# Altium PCB ASCII-v2.0.PcbDoc (part 4 of 5)
Units mil, origin at the board's own origin, x right, y up, seen from the top; angles counter-clockwise.
Board outline 1968.5 x 4921.26 mil, 4 copper layers (Top Layer, Layer 1, Layer 2, Bottom Layer), stack 62.45 mil thick; 272 components, 175 nets, 1155 pads, 394 vias.
Unrouted connection lines stored in the file: 146.
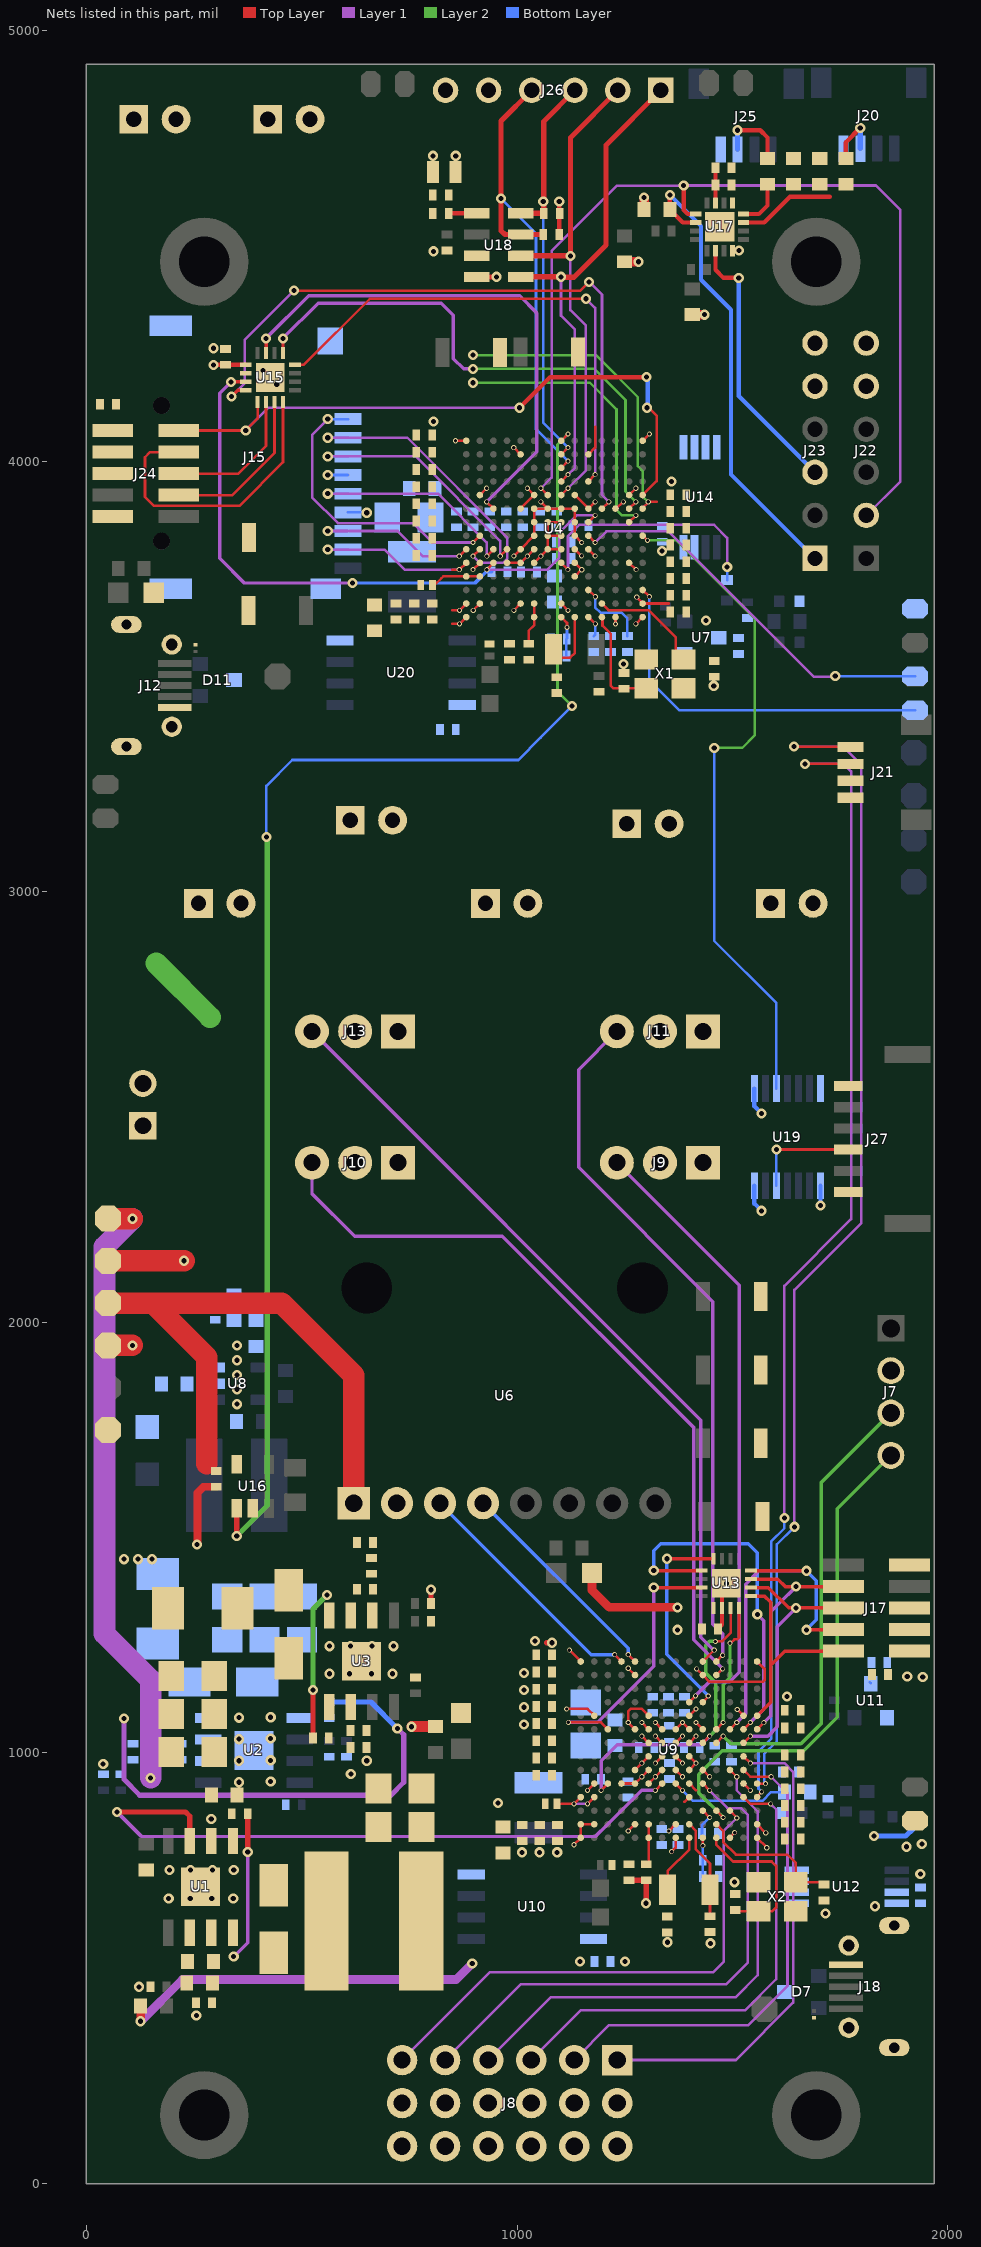
[diagram p4: the nets of this part, all layers, seen from the top]

## Via types
v1: diameter 23.62, hole 11.81, Top Layer to Bottom Layer, tented both sides, 119 vias
v2: diameter 23.62, hole 11.81, Top Layer to Bottom Layer, 104 vias
v3: diameter 11.81, hole 7.87, Top Layer to Bottom Layer, 89 vias
v4: diameter 11.81, hole 7.87, Top Layer to Bottom Layer, tented both sides, 82 vias

## Nets (pads, with @x,y where several pads share a name; then routed paths per layer and width w, separated by ;. In a path a pad name is that pad's centre, name@x,y a point inside that pad or via, vN(x,y) a via of type N, cw(c..) or ccw(c..) an arc to the next point about the centre after c; other vN are vias at no path point) (continued)
F13_1: (continued)
  Top Layer w6: U4.F13@1260.2,3889.74 v3(1275.95,3905.49)
  Top Layer w8: U15.13@456.53,4251.09 v2@456.53,4285.16
  Layer 1 w8: v2(456.37,4285) 538.37,4367 824,4367 852,4339 852,4238 875.83,4214.17 v2(897.8,4214.17)
  Layer 2 w6: v2(897.8,4214.17) 1179.83,4214.17 1252,4142 1252,3929.44 v3(1275.95,3905.49)
G11: J7.3 U9.G11 | length 1065.3
  Top Layer w6: U9.G11@1462.98,1023.51 v4(1478.73,1039.26)
  Layer 2 w8: v4(1478.73,1039.26) 1496.98,1021.01 1659.37,1021.01 1707,1068.64 1707,1628.43 J7.3@1868,1789.43
GND: C3.1 C4.1 C5.1 C6.1 C7.1 C8.1 C9.1 C10.1 C11.1 C13.1 C14.1 C15.1 C16.1 C17.1 C18.1 C19.1 C20.1 C21.1 C22.1 C23.1 C24.1 C25.1 C26.1 C27.1 C29.1 C30.1 C31.1 C32.1 C33.1 C34.1 C35.1 C36.1 C37.1 C38.1 C39.1 C40.1 C41.1 C42.1 C43.1 C44.1 C45.1 C46.1 C47.1 C48.1 C49.1 C50.1 C51.1 C52.1 C53.1 C54.1 C55.1 C56.1 C57.1 C58.1 C59.1 C60.1 C61.1 C62.1 C63.1 C64.1 C65.1 C66.1 C67.1 C68.1 C69.1 C70.1 C71.1 C72.2 C73.2 C74.1 C75.1 C76.2 C77.2 C78.1 C79.1 C80.1 C81.1 C82.1 C83.1 C84.1 C85.1 C86.1 C87.1 C88.1 C89.1 C90.1 C91.1 C92.1 C93.1 C94.1 C95.1 C96.1 C97.1 C98.1 C99.1 C100.1 C101.1 C102.1 C103.1 C104.1 C105.1 C106.1 C107.1 C108.1 C109.1 C110.1 C111.1 C112.1 C113.1 C114.1 C115.1 C116.1 C117.1 C118.2 C119.2 C120.1 C121.1 C122.1 C123.1 C124.2 C125.2 C126.1 C127.1 C128.1 C129.1 C130.1 C131.2 C132.1 C133.1 C134.1 D1.2 D2.2 D3.1 D4.2 D6.1 D7.3 D11.3 J1.2 J2.2 J3.2 J5.2 J6.2 J7.2 J8.3 J8.6 J8.9 J8.12 J8.15 J8.18 J9.2 J10.2 J11.2 J12.5 J12.S1 J12.S2 J12.S3 J12.S4 J13.2 J15.6 J15.MP1 J15.MP2 J15.MP3 J15.MP4 J16.2 J17.3 J17.5 J17.9 J18.5 J18.S1 J18.S2 J18.S3 J18.S4 J19.2 J20.1 J21.1 J22.6 J23.6 J24.3 J24.5 J24.9 J25.1 J26.6 J27.1 LED1.2 R4.1 R5.1 R8.1 R9.1 R11.1 R19.1 R20.1 R22.1 R24.1 SB4.2 SB6.2 SW1.2 SW2.2 SW3.2 SW4.1 SW5.2 SW6.2 SW7.2 SW8.1 TP2.2 TP8.1 TP15.2 U1.7 U1.9 U2.7 U2.9 U3.7 U3.9 U4.A1 U4.A14 U4.B5 U4.B10 U4.E2 U4.E13 U4.G7 U4.G8 U4.H7 U4.H8 U4.J7 U4.J8 U4.K2 U4.K6 U4.K9 U4.K13 U4.L9 U4.N1 U4.N2 U4.N5 U4.N8 U4.P1 U4.P14 U6.2 U7.1 U8.2 U9.A1 U9.A14 U9.B5 U9.B10 U9.E2 U9.E13 U9.G7 U9.G8 U9.H7 U9.H8 U9.J7 U9.J8 U9.K2 U9.K6 U9.K9 U9.K13 U9.L9 U9.N1 U9.N2 U9.N5 U9.N8 U9.P1 U9.P14 U10.4 U11.1 U12.1 U12.2 U12.3 U12.4 U12.7 U13.2 U13.17 U14.1 U14.2 U14.3 U14.4 U14.7 U15.2 U15.17 U16.2 U17.13 U17.17 U18.3 U19.7 U20.4 X1.2 X1.4 X2.2 X2.4 | length 1870.7
  Top Layer w6: 849.57,3622.02 v3(866.5,3622.02) U4.P1@882.25,3637.77 ; 849.57,3653.52 v3(866.5,3653.52) U4.N1@882.25,3669.27 ; v3(857.1,4047.22) 857.22,4047.22 U4.A1@882.25,4047.22 ; v3(897.68,3748.17) 897.92,3748.17 913.51,3763.76 U4.K2@913.74,3763.76 ; v3(898.31,3653.52) 898.31,3653.68 913.74,3669.11 U4.N2@913.74,3669.27 ; U4.E2@913.74,3921.24 v3(929.49,3936.98) ; v3(992.48,4031.47) U4.B5@1008.23,4015.72 ; v3(992.8,3653.52) 992.8,3653.68 1008.23,3669.11 U4.N5@1008.23,3669.27 ; U4.K6@1039.73,3763.76 v3(1055.48,3779.5) U4.J7@1071.22,3795.25 ; U4.N8@1102.72,3669.27 v3(1118.47,3653.52) ; U4.J8@1102.72,3795.25 U4.J7@1071.22,3795.25 ; U4.H8@1102.72,3826.75 U4.H7@1071.22,3826.75 ; U4.G8@1102.72,3858.24 U4.G7@1071.22,3858.24 U4.H7@1071.22,3826.75 ; v4(1115.35,1102.25) 1163.77,1102.25 U9.E2@1179.52,1086.5 ; v4(1121.64,1238.88) U9.A1@1148.02,1212.49 ; v4(1132.28,786.98) 1132.28,787.13 1148.02,802.88 U9.P1@1148.02,803.04 U9.N1@1148.02,834.54 U9.N2@1179.52,834.54 ; U4.L9@1134.22,3732.26 1134.49,3732.26 1150.01,3747.78 v3(1150.28,3747.78) ; U4.K9@1134.22,3763.76 v3@1149.96,3748.01 ; v4(1163.77,913.28) U9.K2@1179.52,929.02 ; U4.B10@1165.71,4015.72 1181.46,4031.47 1181.46,4079.9 ; v4(1258.26,818.79) U9.N5@1274.01,834.54 ; v4(1258.26,1196.74) U9.B5@1274.01,1180.99 ; U4.K13@1260.2,3763.76 1260.49,3763.76 1276.24,3748.01 v3(1276.54,3748.01) ; U4.E13@1260.2,3921.24 v3(1275.95,3936.98) ; v3(1275.93,3622) U4.P14@1291.62,3637.69 ; U4.A14@1291.7,4047.22 v3(1307.44,4062.97) ; U9.K6@1305.5,929.02 v4(1321.25,944.77) U9.J7@1337,960.52 ; v4(1321.25,976.27) U9.H7@1337,992.02 ; v4(1321.25,1039.26) U9.G7@1337,1023.51 ; v4(1352.75,818.79) U9.N8@1368.5,834.54 ; U9.J8@1368.5,960.52 v4(1384.24,944.77) ; U9.H8@1368.5,992.02 v4(1384.24,976.27) ; U9.G8@1368.5,1023.51 v4(1384.24,1039.26) ; 1388.76,886.28 U9.L9@1399.99,897.53 ; U9.K9@1399.99,929.02 1415.74,913.28 ; v4(1416.98,1195.5) U9.B10@1431.49,1180.99 1447.48,1165 1571,1165 1575,1169 1575,1194.96 U9.A14@1557.47,1212.49 ; v4(1511.47,1101.01) U9.E13@1525.98,1086.5 ; U9.K13@1525.98,929.02 v4(1541.72,913.28) ; U9.P14@1557.47,803.04 v4@1580.3,780.21 ; U4.J7@1071.22,3795.25 U4.H7@1071.22,3826.75
  Top Layer w10: C80.1@1466.5,1288 1476.16,1297.66 U13.2@1476.16,1336.91 1476.16,1384.16 v1(1486,1394)
  Top Layer w12: C30.1@1260,704.52 C31.1@1300,704.52 1300,651.5 v1(1299.5,651.01)
  Top Layer w18: v1(257,1484) 258,1485 258,1604.1 271.9,1618 C128.1@301.5,1618
  Top Layer w22: v2(410,4210) 420,4210 425,4205 425,4194 U15.17@427,4194
  Bottom Layer w6: J15.6@607.54,3881.05 649.95,3881.05 v2(651,3880)
  other v1: 255.28,390.29 122,457 1251,516 1449,558 1349.37,560.37 1716.5,627.01 191.11,662.12 241.11,662.12 291.11,662.12 341.11,662.12 1505,700 1936.5,719.01 193.11,728.12 242.11,728.12 293.11,728.12 342.11,728.12 1011.28,769.29 1052.28,769.29 1093.28,769.29 1904.48,782.28 1940,788.26 354,932 428,934 354,982 651,982 428,983 354,1032 428,1034 1016,1066.21 354,1082 428,1083 1016,1106.14 1016,1146.07 564.81,1184 611,1184 662,1184 711,1184 1016,1186 564.81,1248 613,1248 663,1248 713,1248 1042,1260 350,1946
  other v2: 350,1810 350,1844 350,1878 350,1912 1456.75,3478.22 1247,3529 442.09,4178 295,4262 806.21,4487.21 805,4709
  other v4: 1580,779.91
H13: J8.1 U9.H13 | length 1129.2
  Top Layer w6: U9.H13@1525.98,992.02 v4(1541.72,976.27)
  Layer 1 w6: J8.1@1233,287 1508,287 1641.19,420.19 1641.19,955.81 1620.73,976.27 v4(1541.72,976.27)
I2C0_SCL: J21.4 U9.K14 | length 2785.2
  Top Layer w6: U9.K14@1557.47,929.02 1576.77,929 v4(1576.91,928.87) ; v2(1643,3337) 1643.69,3336.31 J21.4@1774.44,3336.31
  Layer 1 w6: v2(1643,3337) 1757,3337 1799,3295 1799,2230 1644.2,2075.2 v1(1644.2,1525.2)
  Bottom Layer w6: v4(1576.91,928.87) 1574,931.77 1574,998 1603.15,1027.15 1603.15,1484.15 v1(1644.2,1525.2)
I2C0_SDA: J21.3 U9.L14 | length 2697.7
  Top Layer w6: U9.L14@1557.47,897.53 1557.47,898.25 1568.19,908.96 v4(1568.19,909.68) ; v2(1669,3297) 1669.06,3296.94 J21.3@1774.44,3296.94
  Layer 1 w6: v1(1620.88,1545.85) 1620.88,2084.86 1775.68,2239.66 1775.68,3279.32 1758.03,3296.97 v2(1669,3297)
  Bottom Layer w6: v4(1568.19,909.68) 1560.77,917.09 1560.77,1003.48 1589.92,1032.62 1589.92,1490.92 1620.88,1521.88 v1(1620.88,1545.85)
I2C1_SCL: TP10.1 U4.M14 | length 862.3
  Top Layer w6: U4.M14@1291.7,3700.76 v3(1307.44,3685.17)
  Bottom Layer w6: v3(1307.44,3685.17) 1307.44,3490.85 1377.04,3421.26 TP10.1@1924.44,3421.26
I2C1_SDA: TP10.2 U4.H10 | length 917.3
  Top Layer w6: U4.H10@1165.71,3826.75 v3(1181.46,3811)
  Layer 1 w6: v3(1181.46,3811) 1207.46,3837 1352,3837 1690,3499 1737,3499 v2(1739,3501)
  Bottom Layer w6: v2(1739,3501) 1740,3500 TP10.2@1924.44,3500
I2C2_SCL: J26.4 R27.1 U4.C8 U18.7 | length 1153.8
  Top Layer w6: U4.C8@1102.72,3984.23 v3(1118.47,3999.98)
  Top Layer w12: J26.4@1034,4861 963,4790 963,4535 972,4526 R27.1@1061,4526
  Bottom Layer w6: v2(963,4610) 1044,4529 1044,4074.44 v3(1118.47,3999.98)
I2C2_SDA: J26.3 R29.1 U4.B8 U18.8 | length 986.6
  Top Layer w6: U4.B8@1102.72,4015.72 v3(1118.47,4031.47)
  Top Layer w12: U18.8@1009,4575.43 1061.57,4575.43 R29.1@1062,4575 1062,4789 J26.3@1134,4861
  Bottom Layer w6: v2(1061,4603) 1061,4088.94 v3(1118.47,4031.47)
INT_0: J22.2 U4.E7 U17.1 | length 2311.1
  Top Layer w6: v3(1055.48,3936.98) U4.E7@1071.22,3921.24
  Top Layer w10: v2(1387,4640) 1387,4583.02 1396.33,4573.69 U17.1@1415.17,4573.69
  Layer 1 w6: v3(1055.48,3936.98) 1080.38,3961.89 1080.38,4488.38 1231.81,4639.81 1386.81,4639.81 v2(1387,4640) 1833.67,4640 1890,4583.67 1890,3953 J22.2@1811,3874
INT_1: J26.2 U4.E8 U18.6 | length 1139.4
  Top Layer w6: U4.E8@1102.72,3921.24 v3(1118.47,3936.98)
  Top Layer w12: U18.6@1009,4477 1123,4477 v2(1124,4476) 1124,4751 J26.2@1234,4861
  Layer 1 w6: v3(1118.47,3936.98) 1160,3978.52 1160,4315 1124,4351 v2(1124,4476)
INT_2: J26.1 U4.D8 U18.5 | length 1142.6
  Top Layer w6: U4.D8@1102.72,3952.73 v3(1118.47,3968.48)
  Top Layer w12: U18.5@1009.21,4428 1108,4428 1109,4427 1132,4427 1207,4502 1207,4734 J26.1@1334,4861
  Layer 1 w6: v2(1102.19,4428) 1102.19,4337.81 1134.37,4305.63 1134.37,3984.39 v3(1118.47,3968.48)
J11: U6.3 U9.A4 | length 573.7
  Top Layer w6: v4(1226.76,1228.24) U9.A4@1242.51,1212.49
  Bottom Layer w8: U6.3@821,1580 1172.76,1228.24 v4(1226.76,1228.24)
J12: J8.10 U9.J12 | length 1210.8
  Top Layer w6: U9.J12@1494.48,960.52 v4(1510.23,944.77)
  Layer 1 w6: J8.10@933,287 1079,433 1508,433 1559,484 1559,864.5 1510.23,913.28 v4(1510.23,944.77)
J13: J8.4 U9.J13 | length 1138.5
  Top Layer w6: U9.J13@1525.98,960.52 1541.72,944.77 v4(1590.15,944.77)
  Layer 1 w6: J8.4@1133,287 1214,368 1537,368 1628.19,459.19 1628.19,906.73 v4(1590.15,944.77)
JTAG_TCK/SWD_CLK: J17.4 U9.F12 U13.8 | length 876.9
  Top Layer w6: U9.F12@1494.48,1055.01 v4(1510.23,1070.76)
  Top Layer w8: U13.8@1543.09,1423.53 v1@1672,1423.53 ; v1@1672,1286.51 J17.4@1757.96,1286.51
  Layer 1 w8: v4(1510.23,1070.76) 1531,1091.53 1531,1392 1562,1423 v1(1672,1423)
  Bottom Layer w8: v1(1672,1286) 1695,1309 1695,1400 v1(1672,1423)
JTAG_TCK/SWD_CLK_1: J24.4 U4.F12 U15.8 | length 711.1
  Top Layer w6: J24.4@214.77,4021 148,4021 136,4009 136,3917 157,3896 355,3896 456.53,3997.53 U15.8@456.53,4136.91 ; U4.F12@1228.7,3889.74 1229.93,3889.74 1245.68,3905.49 v3(1246.91,3905.49)
JTAG_TDI: J17.8 U9.F14 U13.7 | length 591.4
  Top Layer w6: U9.F14@1557.47,1055.01 v4@1573.22,1070.76 ; v4(1573.22,1070.6) v4@1573.38,1070.76
  Top Layer w8: U13.7@1543.09,1403.84 1605.16,1403.84 1622.49,1386.51 v1(1648,1386.51) J17.8@1757.96,1386.51
  Layer 1 w8: v4(1573.22,1070.6) 1589,1086.38 1589,1327.51 1607.67,1346.18 v1(1648,1386.51)
JTAG_TDI_1: J24.8 U4.F14 U15.7 | length 1095.4
  Top Layer w6: J24.8@214.77,3921 339,3921 436.84,4018.84 U15.7@436.84,4136.91 ; U4.F14@1291.7,3889.74 1291.7,3891 1304.77,3904.07 v3(1304.77,3905.34) ; v3@1307.44,3905.49 1324.37,3905.49
  Layer 2 w6: v2@897.33,4246.01 1182.99,4246.01 1280.38,4148.62 1280.38,3988.25 1291.85,3976.77 1291.85,3918.25 v3(1304.77,3905.34)
  other v2: 897.8,4246.34
JTAG_TDO: J17.6 U9.G13 U13.6 | length 621.8
  Top Layer w6: U9.G13@1525.98,1023.51 v4(1541.72,1039.26)
  Top Layer w8: U13.6@1543.09,1384.16 1583.84,1384.16 1631,1337 v1(1648,1337) ; v1@1648.25,1337.25 1648.49,1337 J17.6@1757.47,1337
  Layer 1 w8: v4(1541.72,1039.26) 1582.76,1039.26 1604,1060.5 1604,1293 v1(1648,1337)
JTAG_TDO_1: J24.6 U4.G13 U15.6 | length 995.2
  Top Layer w6: J24.6@214.77,3971 353,3971 417.16,4035.16 U15.6@417.16,4136.91 ; U4.G13@1260.2,3858.24 v3(1275.95,3873.99)
  Layer 2 w6: v2(897.8,4182) 1168.99,4182 1231,4119.99 1231,3887 1244.01,3873.99 v3(1275.95,3873.99)
JTAG_TMS/SWD_IO: J17.2 U9.E14 U13.5 | length 510.9
  Top Layer w8: U13.5@1543.09,1364.47 1574.53,1364.47 1589,1350 1589,1204 ; U9.E14@1557.47,1086.5 1589,1118.03 1589,1204 ; J17.2@1757.96,1236.51 1621.51,1236.51 1589,1204
JTAG_TMS/SWD_IO_1: J24.2 U4.E14 U15.5 | length 1515.9
  Top Layer w6: J24.2@214.77,4071 v2(370,4071) 397.47,4098.47 U15.5@397.47,4136.91 ; U4.E14@1291.7,3921.24 1324,3953.54 1324,4105.81 1305.81,4124 v2(1302.19,4124)
  Top Layer w10: v2(1006,4124) 1077,4195 v2(1301,4195) v2@1302.19,4195
  Layer 1 w6: v2(370,4071) 423,4124 v2(1006,4124)
  Bottom Layer w10: v2(1301,4195) 1303.41,4192.59 1303.41,4125.22 v2(1302.19,4124)
K3: R24.2 U9.G10 U9.K3 U13.3 | length 769.4
  Top Layer w6: v4(1195.27,913.28) U9.K3@1211.02,929.02 ; U9.G10@1431.49,1023.51 v4(1447.24,1039.26) ; v4(1460.58,1259) 1476.07,1259 1495.84,1278.77 U13.3@1495.84,1336.91
  Layer 1 w8: v4(1195.27,913.28) 1195.27,981.77 1232.5,1019.01 1426.98,1019.01 v4(1447.24,1039.26)
  Layer 2 w8: v4(1447.24,1039.26) 1461,1053.02 1461,1163 1438.36,1185.64 1438.36,1250.36 1447,1259 v4(1460.58,1259)
  Bottom Layer w6: v4(1195.27,913.28) R24.2@1195.27,939.02 R24.2@1196.5,939.02
K3_1: R11.2 U4.G10 U4.K3 U15.3 | length 1503.2
  Top Layer w6: v3(929.81,3747.69) 929.81,3748.01 945.24,3763.44 U4.K3@945.24,3763.76 ; U4.G10@1165.71,3858.24 v3(1181.46,3873.99)
  Top Layer w8: v2@335.84,4184.16 U15.3@369.91,4184.16
  Top Layer w10: v2@335.84,4184.16 v2(336,4184)
  Layer 1 w6: v3(929.81,3747.69) 930.12,3748.01 1070.74,3748.01 1098,3775.27 1098,3833.5 1138.49,3873.99 v3(1181.46,3873.99)
  Layer 1 w8: v2(336,4184) 310,4158 310,3774 367,3717 v2(618,3717)
  Bottom Layer w8: v2(618,3717) 902.5,3717 928.5,3743 R11.2@941,3743
K10: J8.13 U9.K10 | length 1274.4
  Top Layer w6: U9.K10@1431.49,929.02 v4(1447.24,913.28)
  Layer 1 w6: J8.13@833,287 1009,463 1486,463 1536,513 1536,856.01 1520,872.01 1488.5,872.01 v4(1447.24,913.28)
K11: U6.4 U9.A5 | length 513.7
  Top Layer w6: v4(1258.26,1228.24) U9.A5@1274.01,1212.49
  Bottom Layer w8: U6.4@921,1580 1258.26,1242.74 v4(1258.26,1228.24)
L13: J8.7 U9.L13 | length 1130
  Top Layer w6: U9.L13@1525.98,897.53 1541.72,881.78 v4(1588.97,881.78) v4@1590.15,881.78
  Layer 1 w6: J8.7@1033,287 1149,403 1530.37,403 1602,474.63 1602,868.75 v4(1588.97,881.78)
M11: J7.4 U9.M11 | length 1181.9
  Top Layer w6: U9.M11@1462.98,866.03 v4(1478.73,850.28)
  Layer 2 w8: v4(1478.73,850.28) 1422,907.02 1422,950 1477,1005 1666,1005 1744,1083 1744,1567 J7.4@1868,1691
M12: J8.16 U9.M12 | length 1210.5
  Top Layer w6: U9.M12@1494.48,866.03 v4@1510.23,850.28 ; v4(1510.23,849.1) v4@1510.34,849.21
  Layer 1 w6: J8.16@733,287 937,491 1456,491 1480,515 1480,818.87 v4(1510.23,849.1)
MISO: J23.3 U17.6 | length 631.6
  Top Layer w10: U17.6@1460.74,4488.74 1460.74,4444.26 1479.5,4425.5 1514.69,4425.5 v2(1515,4425.19)
  Bottom Layer w10: v2(1515,4425.19) 1514.84,4425.34 1514.84,4151.16 J23.3@1692,3974
NetC1_1: C1.1 D4.1 L3.1 U1.8 | length 345.6
  Top Layer w12: v1(374.61,769.93) C1.1@374.61,859.12
  Layer 1 w8: v1(342,527) 374.61,559.61 v1(374.61,769.93)
NetC1_2: C1.2 U1.1
NetC2_1: C2.1 D1.1 L1.1 U2.8 | length 1133.6
  Layer 1 w12: v1(87,1080) 87,939 124,902 707,902 737,932 737,1042.19 v1(722,1057.19)
  Bottom Layer w12: C2.1@564,1118.5 660.69,1118.5 v1(722,1057.19)
NetC2_2: C2.2 U2.1
NetC10_2: C10.2 R3.1 U2.6
NetC11_2: C11.2 R3.2
NetC12_1: C12.1 D2.1 L2.1 U3.8 | length 345.6
  Top Layer w12: C12.1@526,1035 v1(526,1146.19)
  Layer 2 w12: v1(526,1146.19) 526,1334.19 v1(558.81,1367)
NetC12_2: C12.2 U3.1
NetC16_2: C16.2 R7.2 U3.6
NetC17_2: C17.2 R7.1
NetC18_2: C18.2 C19.2 FB3.2 U4.N6 U4.P6 | length 98.7
  Top Layer w6: C18.2@1027.25,3575.72 1027.25,3606.25 1039.73,3618.73 U4.P6@1039.73,3637.77 U4.N6@1039.73,3669.27
NetC20_2: C20.2 C26.2 U4.P8 | length 96.1
  Top Layer w6: U4.P8@1102.72,3637.77 1116,3624.49 v3(1116,3614)
  Bottom Layer w6: C26.2@1114.75,3547.72 1114.75,3586.72 1116,3587.98 v3(1116,3614)
NetC24_2: C24.2 R18.2 U1.6
NetC25_2: C25.2 R18.1
NetC28_1: C28.1 R21.1 R22.2 U8.3
NetC30_2: C30.2 C31.2 FB1.2 U9.N6 U9.P6 | length 95.3
  Top Layer w6: C31.2@1300,741.52 1305.5,747.02 U9.P6@1305.5,803.04 U9.N6@1305.5,834.54
NetC32_2: C32.2 C33.2 U9.P8 | length 36
  Top Layer w6: v4(1359,771.02) 1368.5,780.51 U9.P8@1368.5,803.04
NetC34_2: C34.2 C35.2 U9.P10 | length 91.1
  Top Layer w6: U9.P10@1431.49,803.04 v4(1431.5,785.01) v4@1432.59,785.01
  Bottom Layer w6: C35.2@1431.5,713.01 C34.2@1431.5,751.01 v4(1431.5,785.01)
NetC36_2: C36.2 U9.M10 | length 76.9
  Top Layer w6: U9.M10@1431.49,866.03 v4(1447.24,850.28)
  Bottom Layer w6: C36.2@1429.5,803.03 C36.2@1429.5,813.01 1429.5,832.55 v4(1447.24,850.28)
NetC56_2: C56.2 C57.2 C58.2 C59.2 FB2.2 U9.L1 U9.L2 | length 115.4
  Top Layer w6: FB2.2@1093,882.02 1093.24,881.78 v4(1132.28,881.78) U9.L1@1148.02,897.53 ; v4(1163.77,881.78) U9.L2@1179.52,897.53
  Layer 1 w6: v4(1132.28,881.78) v4(1163.77,881.78)
NetC61_2: C61.2 C62.2 C63.2 C64.2 C65.2 C66.2 C67.2 C68.2 C69.2 C70.2 C71.2 C74.2 L5.1 U9.F6 U9.F7 U9.F8 U9.F9 U9.G6 U9.G9 U9.H6 U9.H9 U9.J5 U9.J9 | length 222.7
  Top Layer w6: U9.J5@1274.01,960.52 v4(1289.76,976.27) U9.H6@1305.5,992.02 ; v4(1289.76,1039.26) U9.G6@1305.5,1023.51 ; v4(1289.76,1070.76) U9.F6@1305.5,1055.01 ; v4(1321.25,1070.76) U9.F7@1337,1055.01 ; U9.F8@1368.5,1055.01 v4(1384.24,1070.76) U9.F9@1399.99,1055.01 ; U9.J9@1399.99,960.52 v4(1415.74,976.27) U9.H9@1399.99,992.02 ; U9.G9@1399.99,1023.51 v4(1415.74,1039.26)
NetC72_1: C72.1 U9.N11 X2.1 | length 346.7
  Top Layer w6: U9.N11@1462.98,834.54 1478.5,819.02 1478.5,793.64 1508.13,764.01 1627.52,764.01 1647.31,744.22 X2.1@1647.31,699.48 C72.1@1712.71,699.48
NetC73_1: C73.1 U9.P11 X2.3 | length 371.5
  Top Layer w6: U9.P11@1462.98,803.04 1462.5,803.52 1462.5,787.01 1501.5,748.01 1591.5,748.01 1601.5,738.01 1601.5,640.92 1593.13,632.55 X2.3@1560.69,632.55 C73.1@1507,632.55
NetC76_1: C76.1 U9.P9 X3.2 | length 141.8
  Top Layer w6: X3.2@1349.79,682.02 1349.79,726.06 1399.99,776.27 U9.P9@1399.99,803.04
NetC77_1: C77.1 U9.N9 X3.1 | length 233.5
  Top Layer w6: U9.N9@1399.99,834.54 1415.5,819.02 1415.5,776.02 1448.21,743.31 X3.1@1448.21,682.02 C77.1@1448.21,621.02
NetC78_2: C78.2 C79.2 D10.1 U9.K8 | length 277.4
  Top Layer w6: U9.K8@1368.5,929.02 v4(1384.24,913.28)
  Bottom Layer w6: v4(1384.24,913.28) 1408.51,889.01 1570.01,889.01 1590.02,909.02 C78.2@1621,909.02
NetC81_2: C81.2 C82.2 U4.P10 | length 52.8
  Top Layer w6: U4.P10@1165.71,3637.77 1166.03,3637.77 1181.78,3622.02 v3(1182.09,3622.02)
  Bottom Layer w6: C82.2@1178.25,3593.72 1181.46,3596.94 1181.46,3621.39 v3(1182.09,3622.02)
NetC83_2: C83.2 U4.M10 | length 174.1
  Top Layer w6: U4.M10@1165.71,3700.76 1166.03,3700.76 1181.78,3685.02 v3(1182.09,3685.02)
  Bottom Layer w6: v3(1182.09,3685.02) 1181.46,3684.39 1181.46,3660.54 1194,3648 1243,3648 1256.25,3634.75 C83.2@1256.25,3593.72
NetC102_2: C102.2 C103.2 C104.2 C105.2 FB4.2 U4.L1 U4.L2 | length 118.1
  Top Layer w6: FB4.2@804,3712 808.39,3712 824.39,3728 828.65,3732.26 U4.L2@913.74,3732.26
NetC107_2: C107.2 C108.2 C109.2 C110.2 C111.2 C112.2 C113.2 C114.2 C115.2 C116.2 C117.2 C120.2 L6.1 U4.F6 U4.F7 U4.F8 U4.F9 U4.G6 U4.G9 U4.H6 U4.H9 U4.J5 U4.J9 | length 353.7
  Top Layer w6: v3(992.8,3779.66) v3(992.8,3779.66) U4.J5@1008.23,3795.25 U4.J5@1008.23,3795.25 U4.H6@1039.73,3826.75 U4.G6@1039.73,3858.24 U4.F6@1039.73,3889.74 U4.F7@1071.22,3889.74 ; v3(1055.48,3905.49) U4.F7@1071.22,3889.74 ; U4.J9@1134.22,3795.25 1134.37,3795.25 1149.81,3779.82 v3(1149.96,3779.82) ; v3(1149.96,3811) U4.H9@1134.22,3826.75 U4.G9@1134.22,3858.24 U4.F9@1134.22,3889.74 U4.F8@1102.72,3889.74 U4.F7@1071.22,3889.74
NetC118_1: C118.1 U4.N11 X1.1 | length 262.7
  Top Layer w6: U4.N11@1197.21,3669.27 1212.48,3654 1304.85,3654 1369,3589.85 1369,3557.07 X1.1@1386.86,3539.2
NetC119_1: C119.1 U4.P11 X1.3 | length 253
  Top Layer w6: U4.P11@1197.21,3637.77 1198.47,3636.51 1198.47,3618.09 1218,3598.57 1218,3478 1223.72,3472.28 1248.25,3472.28 X1.3@1300.25,3472.28
NetC121_2: C121.2 C122.2 D14.1 U4.K8 | length 591.4
  Top Layer w6: U4.K8@1102.72,3763.76 1102.72,3763.6 1118.15,3748.17 v3(1118.15,3748.01)
  Layer 1 w6: v3(1118.15,3748.01) 1118.47,3748.32 1118.47,3825.97 1144.5,3852 1458,3852 1488,3822 v2(1488,3754)
  Bottom Layer w6: D14.1@1488,3723.62 v2(1488,3754)
NetC124_1: C124.1 U4.P9 X4.2 | length 135.8
  Top Layer w6: X4.2@1086.12,3543.5 1123.02,3543.5 1134.22,3554.69 U4.P9@1134.22,3637.77